# Altium PCB ublox_gnss_node.PcbDoc (part 5 of 5)
Units mm, origin at the board's own origin, x right, y up, seen from the top; angles counter-clockwise.
Board outline 84 x 108.04 mm, 6 copper layers (Top Layer (HSig), L2 GND, L3 Signal X, L4 PWR, L5 GND, Bottom Layer (Y)), stack 1.538 mm thick; 222 components, 159 nets, 892 pads, 1025 vias.
Unrouted connection lines stored in the file: 345.
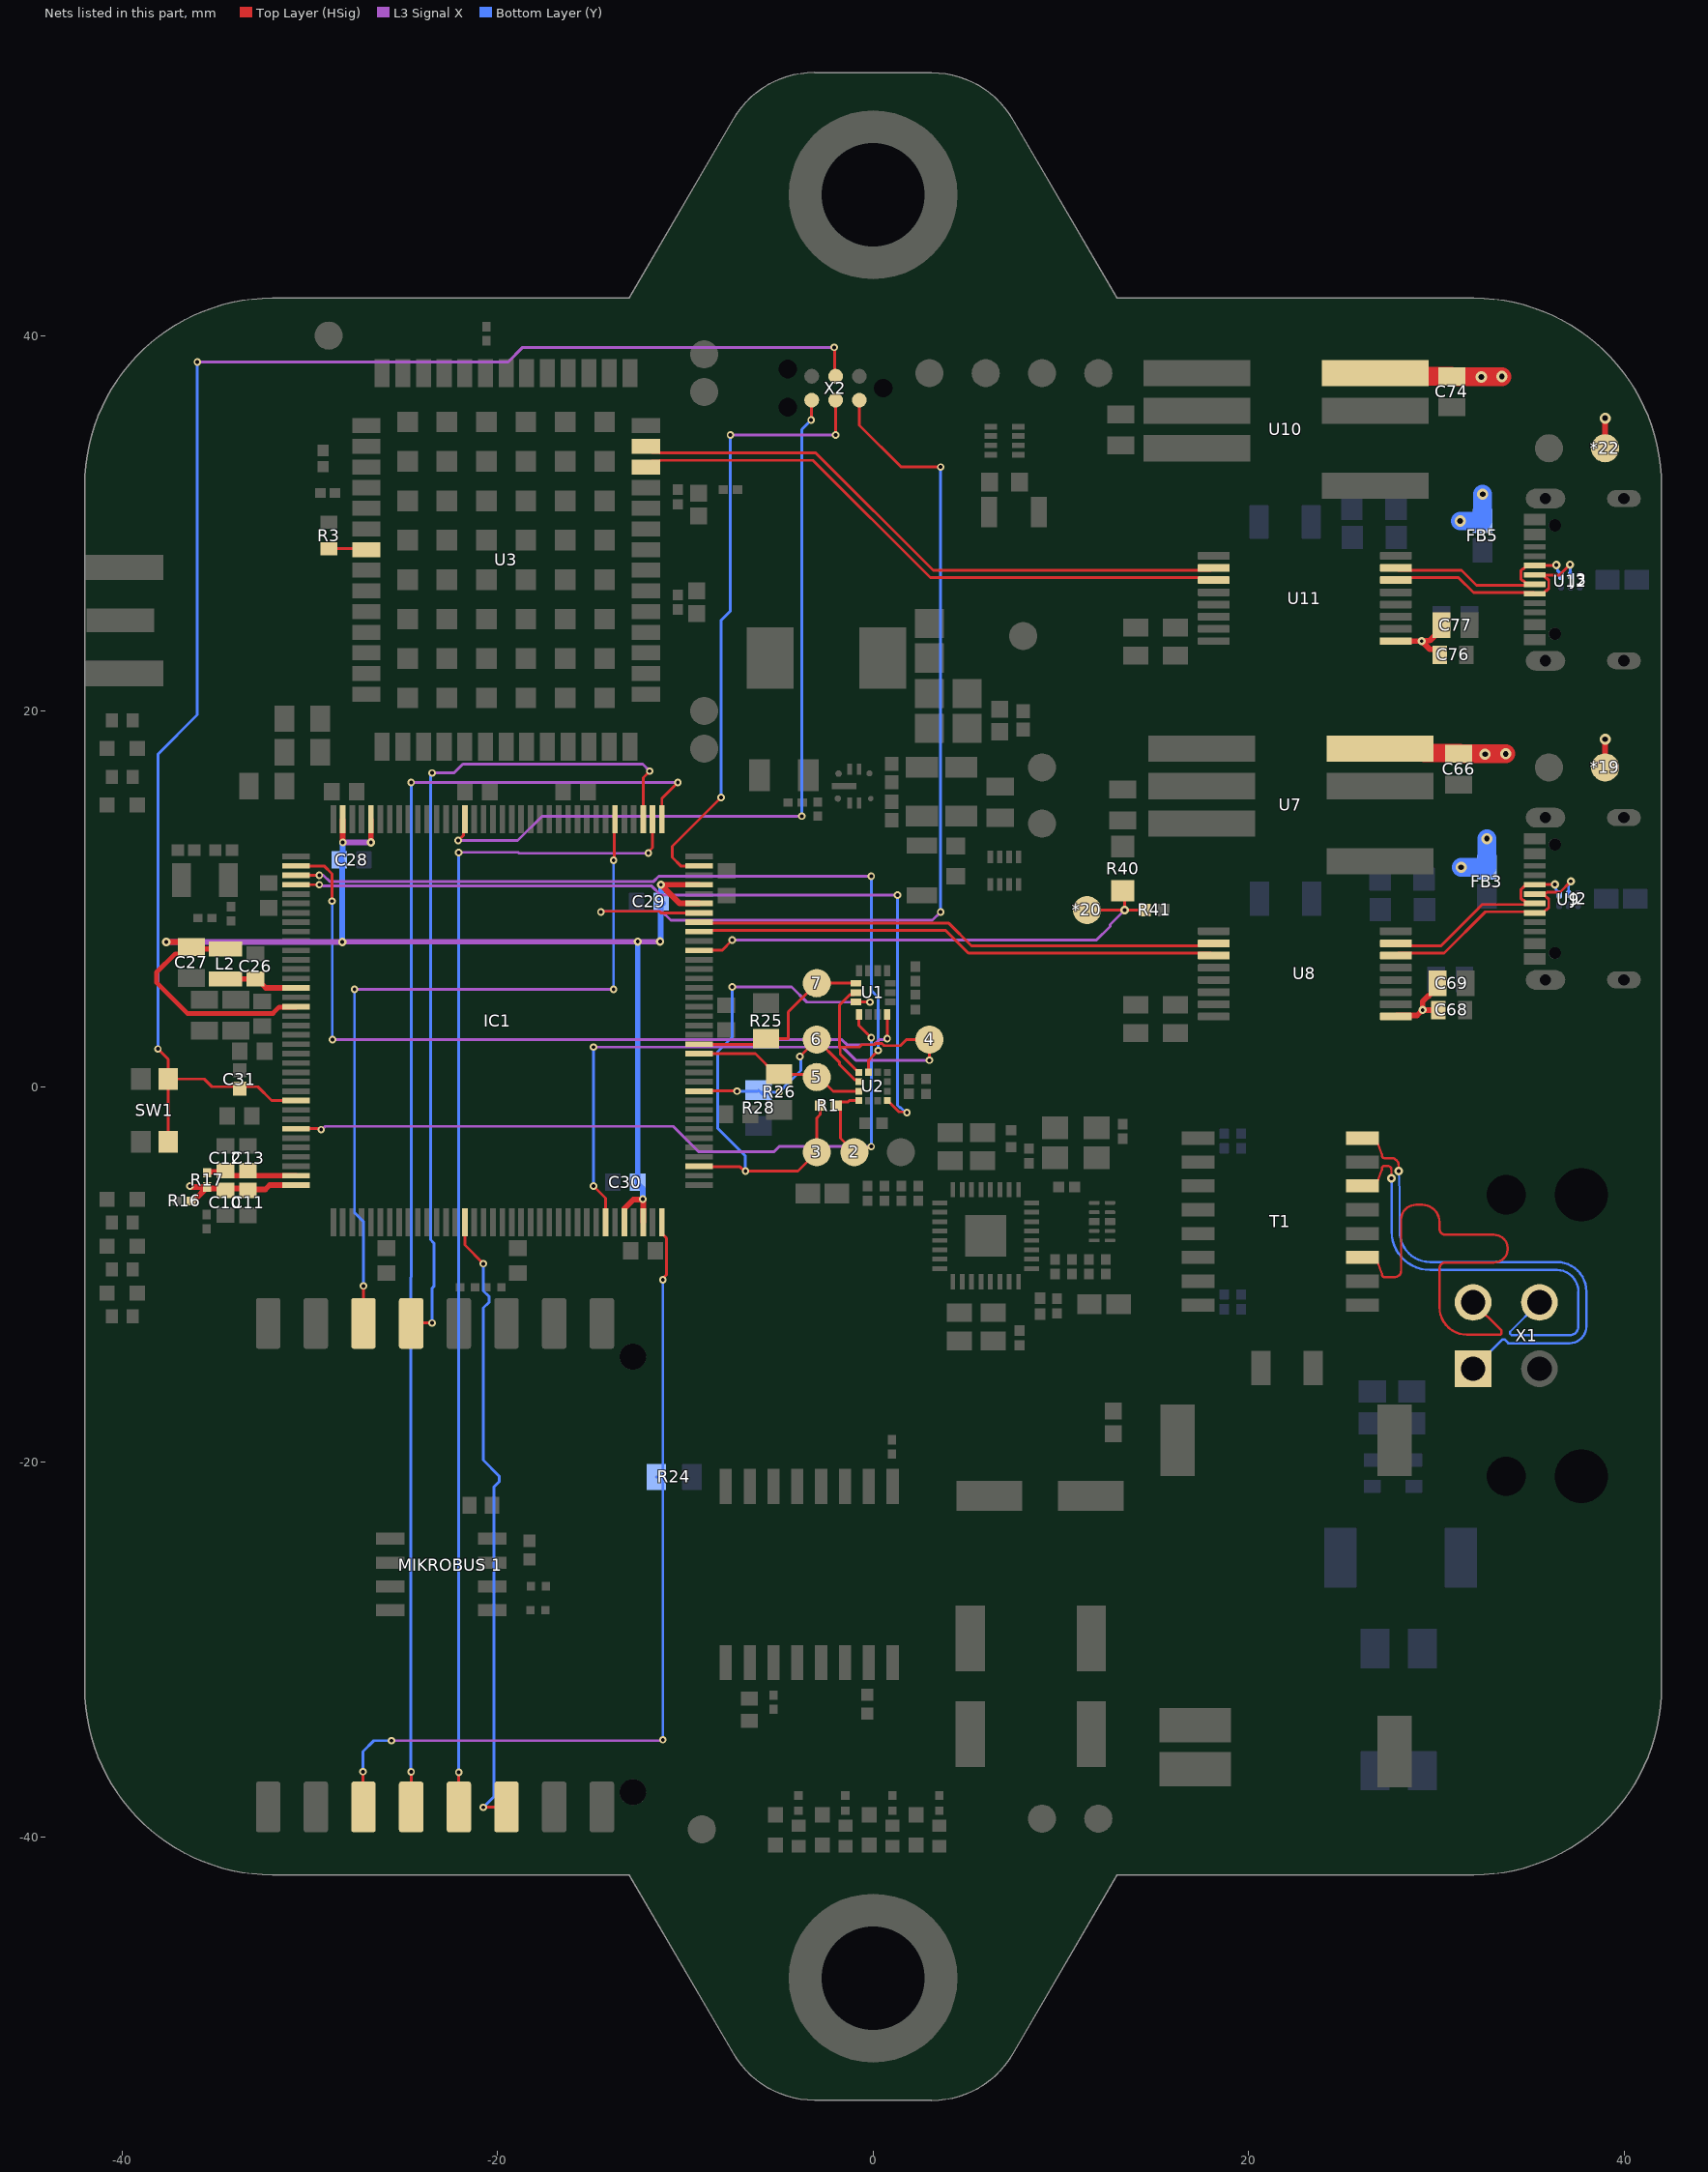
[diagram p8: the nets of this part, all layers, seen from the top]

## Via types
v1: diameter 0.4, hole 0.2, Top Layer (HSig) to Bottom Layer (Y), tented both sides, 916 vias
v2: diameter 0.45, hole 0.2, Top Layer (HSig) to Bottom Layer (Y), tented both sides, 53 vias
v3: diameter 0.6, hole 0.3, Top Layer (HSig) to Bottom Layer (Y), tented both sides, 35 vias
v4: diameter 0.7, hole 0.5, Top Layer (HSig) to Bottom Layer (Y), tented both sides, 13 vias
v5: diameter 0.6, hole 0.4, Top Layer (HSig) to Bottom Layer (Y), tented both sides, 8 vias

## Nets (pads, with @x,y where several pads share a name; then routed paths per layer and width w, separated by ;. In a path a pad name is that pad's centre, name@x,y a point inside that pad or via, vN(x,y) a via of type N, cw(c..) or ccw(c..) an arc to the next point about the centre after c; other vN are vias at no path point) (continued)
RX_P: T1.11 X1.2 | length 25.9
  Top Layer (HSig) w0.124: T1.11@26.075,-9.105 26.888,-9.393 27.102,-9.969 cw(c26.95,-10.025) 27.112,-10.026 ccw(c27.236,-10.026) 27.236,-10.15 27.8,-10.15 ccw(c27.8,-9.824) 28.126,-9.824 28.126,-7.1 cw(c28.925,-7.1) 28.925,-6.301 29.25,-6.301 cw(c29.25,-7.226) 30.175,-7.226 30.175,-7.307 30.175,-7.581 ccw(c30.491,-7.581) 30.491,-7.897 33.072,-7.897 cw(c33.072,-8.637) 33.072,-9.377 30.491,-9.377 ccw(c30.491,-9.693) 30.175,-9.693 30.175,-10.792 30.175,-11.75 ccw(c31.65,-11.75) 31.65,-13.225 33.402,-13.225 33.475,-13.152 33.475,-13.011 X1.2@31.964,-11.5
SENS_ISM_INT: IC1.2 U1.4 | length 42
  Top Layer (HSig) w0.15: IC1.2@-30.738,11.75 -29.25,11.75 -28.825,11.325 v1(-28.825,9.875) ; v1(0.75,2.55) U1.4@0.75,3.838
  L3 Signal X w0.15: v1(-28.8,2.5) -1.67,2.5 -1.395,2.225 0.055,2.225 0.332,2.502 0.702,2.502 v1(0.75,2.55)
  Bottom Layer (Y) w0.15: v1(-28.825,9.875) -28.813,9.862 -28.813,2.512 v1(-28.8,2.5)
SENS_LSM_INT: IC1.3 U2.12 | length 41.7
  Top Layer (HSig) w0.15: IC1.3@-30.738,11.25 v1(-29.5,11.25) ; U2.12@-0.25,0.763 -0.25,1.396 0.229,1.875 0.275,1.875 v1(0.275,1.921)
  L3 Signal X w0.15: v1(-29.5,11.25) -29.28,11.25 -28.955,10.925 -11.691,10.925 -11.416,11.2 v1(-0.1,11.2)
  Bottom Layer (Y) w0.15: v1(-0.1,11.2) -0.1,5.12 0.275,4.745 v1(0.275,1.921)
SENS_LSM_INTM: IC1.4 U2.7 | length 45.4
  Top Layer (HSig) w0.15: IC1.4@-30.738,10.75 v1(-29.5,10.75) ; U2.7@0.763,-0.75 0.775,-0.75 1.378,-1.353 1.76,-1.353 v1(1.803,-1.397)
  L3 Signal X w0.15: v1(-29.5,10.75) -29.425,10.675 -11.791,10.675 -11.316,10.2 v1(1.3,10.2)
  Bottom Layer (Y) w0.15: v1(1.3,10.2) 1.3,-1 1.437,-1.137 1.476,-1.137 1.736,-1.397 v1(1.803,-1.397)
SPI3_MISO: "MIKROBUS 1.5" IC1.110 | length 62.9
  Top Layer (HSig) w0.15: -22.068,-38.38 v1(-22.068,-36.532) ; v1(-11.975,12.431) -11.931,12.431 -11.931,12.543 -11.75,12.724 IC1.110@-11.75,14.238
  L3 Signal X w0.15: v1(-22.075,12.468) -22.068,12.475 -18.905,12.475 -18.855,12.425 -11.981,12.425 v1(-11.975,12.431)
  Bottom Layer (Y) w0.15: v1(-22.075,12.468) -22.068,12.461 -22.068,10.462 -22.075,10.455 -22.075,-12.977 -22.068,-12.984 v1(-22.068,-36.532)
SPI3_MOSI: "MIKROBUS 1.6" IC1.51 | length 33.8
  Top Layer (HSig) w0.15: IC1.51@-21.75,-7.238 -21.75,-8.45 v1(-20.76,-9.44) ; v1(-20.76,-38.4) -20.74,-38.38 -19.528,-38.38
  Bottom Layer (Y) w0.15: v1(-20.76,-38.4) -20.2,-37.84 -20.2,-21.33 -19.925,-21.055 -19.925,-20.745 -20.76,-19.91 -20.76,-11.796 -20.46,-11.496 -20.46,-11.185 -20.76,-10.885 v1(-20.76,-9.44)
SPI3_SCLK: "MIKROBUS 1.4" IC1.109 | length 71.1
  Top Layer (HSig) w0.15: -24.608,-38.38 v1(-24.608,-36.508) ; IC1.109@-11.25,14.238 -11.25,15.35 v1(-10.4,16.2)
  L3 Signal X w0.15: v1(-24.608,16.192) -24.6,16.2 -24.596,16.196 -10.404,16.196 v1(-10.4,16.2)
  Bottom Layer (Y) w0.15: v1(-24.608,-36.508) -24.625,-36.492 -24.625,-10.166 -24.608,-10.149 v1(-24.608,16.192)
SPI_CS: "MIKROBUS 1.3" IC1.72 R24.1 | length 47
  Top Layer (HSig) w0.15: v1(-27.175,-36.5) -27.175,-38.353 -27.148,-38.38 ; IC1.72@-11.25,-7.238 -11.25,-7.826 -11,-8.076 -11,-10.032 -11.2,-10.232 v1(-11.2,-10.3)
  L3 Signal X w0.15: v1(-25.65,-34.85) -11.25,-34.85 v1(-11.2,-34.8)
  Bottom Layer (Y) w0.15: v1(-27.175,-36.5) -27.175,-35.425 -26.6,-34.85 v1(-25.65,-34.85) ; R24.1@-11.55,-20.8 R24.1@-11.5,-20.8 ; v1(-11.2,-34.8) v1(-11.2,-10.3)
SPI_CS_ISM: 7.1 IC1.88 R25.1 U1.12 | length 10.5
  Top Layer (HSig) w0.15: IC1.88@-9.262,2.25 -6,2.25 R25.1@-5.7,2.55 -4.525,2.55 -4.525,3.975 7.1@-3,5.5 U1.12@-0.913,5.5
SPI_CS_MAG: 5.1 IC1.87 R26.1 U2.3 | length 10.1
  Top Layer (HSig) w0.15: IC1.87@-9.262,1.75 -6.275,1.75 -5.175,0.65 R26.1@-5,0.65 -3.025,0.65 -2.125,-0.25 U2.3@-0.763,-0.25 ; 5.1@-2.95,0.125 -3,0.175 5.1@-3,0.5 ; 5.1@-3,0.5 -3,0.312 5.1@-3,0.5
SPI_CS_XL: 6.1 IC1.83 R28.1 U2.2 | length 11.6
  Top Layer (HSig) w0.15: IC1.83@-9.262,-0.25 -9.237,-0.225 -7.275,-0.225 v1(-7.25,-0.25) ; v1(-3.9,1.6) 6.1@-3,2.5 -1.8,1.3 -1.8,1.178 -0.972,0.35 -0.875,0.35 -0.788,0.263 -0.788,0.225 U2.2@-0.763,0.25
  Bottom Layer (Y) w0.15: v1(-7.25,-0.25) -6.15,-0.25 R28.1@-6.1,-0.2 R28.1@-6,-0.3 ; R28.1@-5.706,-0.425 -5.875,-0.425 R28.1@-6,-0.3 ; v1(-3.9,1.6) -3.852,1.552 -3.852,0.848 v1(-5,-0.3) R28.1@-6,-0.3
SPI_MISO: 2.1 IC1.30 R1.2 U1.1 U2.4 | length 43.9
  Top Layer (HSig) w0.15: IC1.30@-30.738,-2.25 -29.45,-2.25 v1(-29.4,-2.3) ; U2.4@-0.763,-0.75 -1.273,-0.75 -1.339,-0.816 -1.763,-0.816 R1.2@-1.963,-1.016 -1.938,-1.016 -1.738,-1.216 -1.738,-2.762 2.1@-1,-3.5 -0.748,-3.248 -0.148,-3.248 v1(-0.1,-3.2) ; U1.1@-0.75,3.838 -0.75,3.25 v1(-0.1,2.6)
  L3 Signal X w0.15: v1(-29.4,-2.3) -29.362,-2.3 -29.187,-2.125 -10.645,-2.125 -9.295,-3.475 -5.275,-3.475 -5,-3.2 v1(-0.1,-3.2)
  Bottom Layer (Y) w0.15: v1(-0.1,-3.2) v1(-0.1,2.6)
SPI_MOSI: 3.1 IC1.75 R1.1 U1.14 | length 28.5
  Top Layer (HSig) w0.15: IC1.75@-9.262,-4.25 -9.228,-4.284 -7.083,-4.284 -6.868,-4.5 v1(-6.8,-4.5) -4,-4.5 3.1@-3,-3.5 -3,-1.681 -2.813,-1.494 R1.1@-2.813,-1.016 ; U1.14@-0.913,4.5 -0.91,4.497 -0.174,4.497 v1(-0.171,4.494)
  L3 Signal X w0.15: v1(-7.5,5.3) -4.334,5.3 -3.528,4.494 v1(-0.171,4.494)
  Bottom Layer (Y) w0.15: v1(-7.5,5.3) -7.5,2.626 -8.275,1.851 -8.275,-2.225 -6.8,-3.7 v1(-6.8,-4.5)
SPI_SCK: 4.1 IC1.66 U1.13 U2.1 | length 39.1
  Top Layer (HSig) w0.15: v1(-14.9,-5.3) -14.25,-5.95 IC1.66@-14.25,-7.238 ; U1.13@-0.913,5 -1.012,4.9 -1.222,4.9 -1.8,4.322 -1.8,2.1 ; U2.1@-0.763,0.75 -0.775,0.75 -1.752,1.727 -1.752,2.052 -1.8,2.1 ; v1(3,1.4) 4.1@3,2.5 1.777,2.5 1.452,2.175 0.595,2.175 0.474,2.296 0.126,2.296 0.055,2.225 -0.602,2.225 -0.727,2.1 -1.8,2.1
  L3 Signal X w0.15: v1(-14.9,2.1) -1.623,2.1 -0.923,1.4 v1(3,1.4)
  Bottom Layer (Y) w0.15: v1(-14.9,-5.3) v1(-14.9,2.1)
SYS_nRESET: C31.2 IC1.27 SW1.1 SW1.3 X2.3 | length 85.8
  Top Layer (HSig) w0.15: v1(-38.1,2) -37.55,1.45 SW1.1@-37.55,0.4 ; SW1.3@-37.55,-2.95 SW1.1@-37.55,0.4 ; IC1.27@-30.738,-0.75 -32.04,-0.75 -32.775,-0.015 -35.22,-0.015 -35.635,0.4 SW1.1@-37.55,0.4 ; v1(-2.075,39.375) -2.037,39.338 -2.037,37.872 X2.3@-2,37.835
  L3 Signal X w0.15: v1(-36,38.6) -19.441,38.6 -18.666,39.375 v1(-2.075,39.375)
  Bottom Layer (Y) w0.15: v1(-38.1,2) -38.1,17.7 -36,19.8 v1(-36,38.6)
SYS_SWDCLK: IC1.107 X2.4 | length 32.9
  Top Layer (HSig) w0.15: IC1.107@-9.262,11.75 -10.25,11.75 -10.7,12.2 -10.7,12.8 v1(-8.1,15.4) ; v1(-2,34.7) X2.4@-2,36.565
  L3 Signal X w0.15: v1(-7.6,34.7) v1(-2,34.7)
  Bottom Layer (Y) w0.15: v1(-8.1,15.4) -8.1,24.834 -7.6,25.334 v1(-7.6,34.7)
SYS_SWDIO: IC1.102 X2.2 | length 54.1
  Top Layer (HSig) w0.15: v1(-14.5,9.3) -14.465,9.335 -11.387,9.335 -11.302,9.25 IC1.102@-9.262,9.25 ; X2.2@-0.73,36.565 -0.73,35.225 1.495,33 v1(3.6,33)
  L3 Signal X w0.15: v1(-14.5,9.3) -14.465,9.335 -11.257,9.335 -10.772,8.85 3.15,8.85 v1(3.6,9.3)
  Bottom Layer (Y) w0.15: v1(3.6,9.3) v1(3.6,33)
SYS_SWO: IC1.130 X2.6 | length 42.5
  Top Layer (HSig) w0.15: v1(-22.1,13.1) -21.825,13.375 -21.825,14.163 IC1.130@-21.75,14.238 ; v1(-3.3,35.5) -3.285,35.515 -3.285,36.55 X2.6@-3.27,36.565
  L3 Signal X w0.15: v1(-22.1,13.1) -18.93,13.1 -17.629,14.4 v1(-3.8,14.4)
  Bottom Layer (Y) w0.15: v1(-3.8,14.4) -3.8,35 v1(-3.3,35.5)
TX_N: T1.14 X1.3 | length 25.4
  Top Layer (HSig) w0.124: T1.14@26.075,-5.295 26.888,-5.007 27.102,-4.431 ccw(c26.95,-4.375) 27.112,-4.375 27.112,-4.361 cw(c27.236,-4.361) 27.236,-4.237 27.425,-4.237 cw(c27.425,-4.423) 27.611,-4.423 v2(27.611,-4.889)
  Bottom Layer (Y) w0.124: v2(27.611,-4.889) 27.626,-4.889 27.626,-7.726 ccw(c29.675,-7.726) 29.675,-9.775 36.425,-9.775 cw(c36.425,-10.925) 37.575,-10.925 37.575,-12.776 cw(c37.1,-12.776) 37.1,-13.251 34.015,-13.251 33.933,-13.169 33.933,-13.067 X1.3@35.5,-11.5
TX_P: T1.16 X1.1 | length 27.2
  Top Layer (HSig) w0.124: T1.16@26.075,-2.755 26.888,-3.043 27.102,-3.619 cw(c26.95,-3.675) 27.112,-3.675 27.112,-3.689 ccw(c27.236,-3.689) 27.236,-3.813 27.594,-3.813 cw(c27.594,-4.219) 28,-4.219 v2(28,-4.5)
  Bottom Layer (Y) w0.124: v2(28,-4.5) 28.05,-5.569 cw(c27.926,-5.575) 28.05,-5.575 28.05,-7.726 ccw(c29.675,-7.726) 29.675,-9.351 36.425,-9.351 cw(c36.425,-10.925) 37.999,-10.925 37.999,-12.776 cw(c37.1,-12.776) 37.1,-13.675 33.839,-13.675 33.633,-13.469 33.531,-13.469 X1.1@31.964,-15.036
UART5_RX: "MIKROBUS 1.14" IC1.114 | length 40.9
  Top Layer (HSig) w0.15: v1(-27.15,-10.625) -27.15,-12.618 -27.148,-12.62 ; v1(-13.825,12.05) -13.787,12.087 -13.787,14.201 IC1.114@-13.75,14.238
  L3 Signal X w0.15: v1(-27.625,5.175) v1(-13.825,5.175)
  Bottom Layer (Y) w0.15: v1(-27.625,5.175) -27.625,-6.714 -27.148,-7.191 -27.148,-10.623 v1(-27.15,-10.625) ; v1(-13.825,5.175) v1(-13.825,12.05)
UART5_TX: "MIKROBUS 1.13" IC1.111 | length 45.2
  Top Layer (HSig) w0.15: -24.608,-12.62 -24.588,-12.6 v1(-23.5,-12.6) ; IC1.111@-12.25,14.238 -12.25,16.45 v1(-11.9,16.8)
  L3 Signal X w0.15: v1(-23.5,16.7) -22.33,16.7 -21.855,17.175 -12.275,17.175 v1(-11.9,16.8)
  Bottom Layer (Y) w0.15: v1(-23.5,-12.6) -23.5,-10.751 -23.4,-10.651 -23.4,-8.335 -23.575,-8.16 -23.575,16.557 -23.5,16.632 v1(-23.5,16.7)
USB_D_N: U3.39 U11.11 | length 33
  Top Layer (HSig) w0.15: U3.39@-12.1,33 -11.775,33.325 -11.368,33.325 -11.337,33.356 -3.204,33.356 3.046,27.106 17.287,27.106 17.288,27.105 18.02,27.105 U11.11@18.15,26.975
USB_D_P: U3.40 U11.10 | length 33
  Top Layer (HSig) w0.15: U3.40@-12.1,34.1 -11.775,33.775 -11.368,33.775 -11.337,33.744 -3.044,33.744 3.206,27.494 17.287,27.494 17.288,27.495 18.02,27.495 U11.10@18.15,27.625
USB_ISOLATED_D_N: J2.A7 J2.B7 U8.6 U9.2 | length 13
  Top Layer (HSig) w0.15: U8.6@27.85,6.975 27.98,7.105 28.712,7.105 28.713,7.106 30.417,7.106 32.617,9.306 35.194,9.306 J2.B7@35.25,9.25 ; J2.B7@35.745,9.325 35.845,9.425 35.892,9.425 35.995,9.528 35.995,9.972 35.792,10.175 35.325,10.175 J2.A7@35.25,10.25 35.792,10.25 35.9,10.357 36.6,10.357 v2(37.175,10.932)
  Bottom Layer (Y) w0.15: U9.2@37.05,10.25 37.05,10.726 37.175,10.851 v2(37.175,10.932)
USB_ISOLATED_D_P: J2.A6 J2.B6 U8.7 U9.1 | length 11.9
  Top Layer (HSig) w0.15: U8.7@27.85,7.625 27.98,7.495 28.712,7.495 28.713,7.494 30.256,7.494 32.456,9.694 J2.A6@34.886,9.694 ; J2.A6@34.905,9.675 J2.A6@34.886,9.694 ; J2.A6@35.25,9.75 35.194,9.694 J2.A6@34.886,9.694 ; v2(36.325,10.757) 36.321,10.754 35.254,10.754 J2.B6@35.25,10.75 35.175,10.675 34.708,10.675 34.505,10.472 34.505,10.028 34.608,9.925 34.655,9.925 J2.A6@34.886,9.694
  Bottom Layer (Y) w0.15: v2(36.325,10.757) 36.382,10.7 36.382,10.482 36.55,10.314 U9.1@36.55,10.225
USB_ISOLATED_GNSS_D_N: J3.A7 J3.B7 U11.6 U12.2 | length 12.2
  Top Layer (HSig) w0.15: U11.6@27.85,26.975 27.98,27.105 28.712,27.105 28.713,27.106 31.183,27.106 31.983,26.306 35.194,26.306 J3.B7@35.25,26.25 35.67,26.25 35.845,26.425 35.892,26.425 35.995,26.528 35.995,26.972 35.892,27.075 35.845,27.075 J3.A7@35.67,27.25 ; J3.A7@35.25,27.25 J3.A7@35.67,27.25 ; v2(37.125,27.8) 36.575,27.25 J3.A7@35.67,27.25
  Bottom Layer (Y) w0.15: v2(37.125,27.8) 37.138,27.788 37.138,27.237 U12.2@37.15,27.225
USB_ISOLATED_GNSS_D_P: J3.A6 J3.B6 U11.7 U12.1 | length 11.8
  Top Layer (HSig) w0.15: U11.7@27.85,27.625 27.98,27.495 28.712,27.495 28.713,27.494 31.344,27.494 32.144,26.694 35.194,26.694 J3.A6@35.25,26.75 34.83,26.75 34.655,26.925 34.608,26.925 34.505,27.028 34.505,27.472 34.608,27.575 34.655,27.575 34.83,27.75 J3.B6@35.25,27.75 35.262,27.762 36.388,27.762 v2(36.4,27.775)
  Bottom Layer (Y) w0.15: v2(36.4,27.775) 36.457,27.718 36.457,27.481 36.65,27.289 U12.1@36.65,27.2
USB_MCU_D_N: IC1.100 U8.11 | length 28
  Top Layer (HSig) w0.15: IC1.100@-9.262,8.25 -9.206,8.306 3.877,8.306 5.077,7.106 17.287,7.106 17.288,7.105 18.02,7.105 U8.11@18.15,6.975
USB_MCU_D_P: IC1.101 U8.10 | length 28
  Top Layer (HSig) w0.15: IC1.101@-9.262,8.75 -9.206,8.694 4.038,8.694 5.238,7.494 17.287,7.494 17.288,7.495 18.02,7.495 U8.10@18.15,7.625
VBUS_DETECT_MCU: *20.1 IC1.98 R40.2 R41.2 | length 27.7
  Top Layer (HSig) w0.15: IC1.98@-9.262,7.25 -8.05,7.25 v1(-7.5,7.8) ; *20.1@11.4,9.4 v2(13.4,9.4) ; R40.2@13.3,10.425 13.4,10.325 v2(13.4,9.4) ; R41.2@14.4,9.4 v2(13.4,9.4)
  L3 Signal X w0.15: v1(-7.5,7.8) 11.9,7.8 12.621,8.521 12.621,8.621 v2(13.4,9.4)
VBUS_GNSS: *22.1 C74.2 C76.2 C77.1 FB5.2 U10.1 U11.1 | length 15.2
  Top Layer (HSig) w0.3: U11.1@27.85,23.725 v2(29.225,23.725) ; C76.2@30.19,23 30.19,23.059 29.96,23.289 29.661,23.289 v2(29.225,23.725) ; C77.1@30.275,24.575 30.275,24.375 29.654,23.754 29.254,23.754 v2(29.225,23.725) ; *22.1@39,34 v3(39,35.6)
  Top Layer (HSig) w1: U10.1@26.75,38 26.91,37.84 30.805,37.84 C74.2@30.825,37.82 v3(33.5,37.82)
  Bottom Layer (Y) w1: v3(31.275,30.125) 32.474,30.125 FB5.2@32.475,30.126 v3(32.475,31.55)
  other v3: 32.4,37.8
VBUS_MCU: *19.1 C66.2 C68.2 C69.1 FB3.2 U7.1 U8.1 | length 15.4
  Top Layer (HSig) w0.3: U8.1@27.85,3.725 27.905,3.78 28.98,3.78 v2(29.275,4.075) ; C68.2@30.04,4.075 v2(29.275,4.075) ; C69.1@30.075,5.5 30.075,5.3 29.59,4.815 29.556,4.815 29.275,4.534 v2(29.275,4.075) ; *19.1@39,17 v3(39,18.5)
  Top Layer (HSig) w1: U7.1@27,18 29.146,18 29.381,17.765 C66.2@31.255,17.765 ; C66.2@31.2,17.72 v3(33.7,17.72)
  Bottom Layer (Y) w1: v3(31.325,11.675) 32.699,11.675 FB3.2@32.7,11.676 v3(32.7,13.2)
  other v3: 32.6,17.7
VCAP: C27.2 C28.2 C29.2 C30.2 IC1.17 IC1.68 IC1.70 IC1.103 IC1.105 IC1.140 IC1.143 L2.2 | length 75.1
  Top Layer (HSig) w0.25: C27.2@-36.327,7.424 -36.682,7.069 -37.181,7.069 -38.175,6.075 -38.175,5.539 -36.526,3.89 -31.973,3.89 -31.638,4.225 -30.763,4.225 IC1.17@-30.738,4.25
  Top Layer (HSig) w0.3: v2(-37.65,7.7) -36.555,7.7 C27.2@-36.3,7.445 ; C27.2@-36.54,7.445 C27.2@-36.3,7.445 ; L2.2@-34.5,7.325 -36.18,7.325 C27.2@-36.3,7.445 ; v1(-28.25,13) IC1.143@-28.25,14.238 ; v2(-26.75,13) IC1.140@-26.75,14.238 ; IC1.68@-13.25,-7.238 -13.25,-6.497 -12.772,-6.019 -12.294,-6.019 v1(-12.275,-6) -12.275,-6.027 -12.25,-6.052 IC1.70@-12.25,-7.238 ; IC1.103@-9.262,9.75 -10.3,9.75 v2(-11.3,10.75) IC1.105@-9.262,10.75
  L3 Signal X w0.3: v2(-37.65,7.7) v2(-28.275,7.7) -28.263,7.712 -11.363,7.712 v2(-11.35,7.725) ; v1(-28.25,13) v2(-26.75,13) ; v2@-12.55,7.725 v2(-12.54,7.715)
  Bottom Layer (Y) w0.3: v2(-28.275,7.7) -28.275,12.015 -28.435,12.175 -28.25,12.36 v1(-28.25,13) ; v2(-12.54,7.715) -12.54,-5.175 -12.275,-5.44 v1(-12.275,-6) ; v2(-11.35,7.725) -11.321,7.754 C29.2@-11.321,9.75 ; v2(-11.3,10.75) -11.295,10.745 -11.295,9.855 C29.2@-11.19,9.75
VCC_RF: R3.2 U3.7 | length 2
  Top Layer (HSig) w0.155: R3.2@-29,28.65 -27.05,28.65 U3.7@-27,28.6
VDD_REF: C12.2 C13.2 IC1.35 R17.2 | length 4.9
  Top Layer (HSig) w0.3: R17.2@-35.475,-4.6 -35.418,-4.543 -34.557,-4.543 C12.2@-34.5,-4.485 ; C12.2@-34.5,-4.51 -34.26,-4.75 IC1.35@-30.738,-4.75
VDD_SMPS_OUT: C26.1 IC1.15 L2.1 | length 3.9
  Top Layer (HSig) w0.3: L2.1@-34.5,5.725 -34.498,5.727 -32.903,5.727 C26.1@-32.9,5.73 ; C26.1@-32.83,5.73 -32.35,5.25 IC1.15@-30.738,5.25
VDDA: C10.2 C11.2 IC1.36 R16.2 R17.1 | length 7.2
  Top Layer (HSig) w0.3: v1(-36.4,-5.3) -36.373,-5.3 -36.323,-5.35 R17.1@-35.475,-5.35 R17.1@-35.475,-5.357 ; R16.2@-36.325,-6.1 -36.25,-6.025 -36.125,-6.025 -35.475,-5.375 R17.1@-35.475,-5.357 ; C10.2@-34.5,-5.515 C10.2@-34.582,-5.432 ; IC1.36@-30.738,-5.25 -32.14,-5.25 -32.38,-5.49 -33.25,-5.49 C11.2@-33.3,-5.54 -33.408,-5.432 C10.2@-34.582,-5.432 ; R17.1@-35.475,-5.357 -35.4,-5.432 C10.2@-34.582,-5.432
pads on no net: "MIKROBUS 1.0" B1.3 IC1.25 IC1.26 IC1.28 IC1.31 IC1.43 IC1.44 IC1.45 IC1.50 IC1.52 IC1.57 IC1.58 IC1.59 IC1.60 IC1.61 IC1.62 IC1.63 IC1.64 IC1.65 IC1.67 IC1.78 IC1.81 IC1.82 IC1.93 IC1.94 IC1.99 IC1.108 IC1.112 IC1.113 IC1.115 IC1.116 IC1.117 IC1.120 IC1.123 IC1.125 IC1.127 IC1.131 IC1.132 IC1.133 IC1.134 IC1.136 IC1.137 IC3.4 IC3.5 IC3.6 IC3.11 IC3.12 IC3.13 IC3.14 J2. J2.A8 J2.B8 J3. J3.A8 J3.B8 T1.4 T1.5 T1.12 T1.13 U1.9 U1.10 U1.11 U2.11 U3.4 U3.5 U3.6 U3.8 U3.9 U3.10 U3.11 U3.13 U3.15 U3.16 U3.17 U3.18 U3.21 U3.22 U3.23 U3.24 U3.25 U3.28 U3.29 U3.30 U3.31 U3.35 U3.44 U3.45 U3.46 U3.47 U3.50 U3.52 U3.54 U4.13 U4.20 U4.21 U4.22 U6.2 U7.4 U7.5 U8.4 U8.5 U8.12 U8.13 U9.3 U9.5 U10.4 U10.5 U11.4 U11.5 U11.12 U11.13 U12.3 U12.5 U13.8 U14.8 X1.6 X1.7 X1.8 X1.9 X2.

## Polygon pours and split planes (outlines as drawn)
+3V3 on L4 PWR "+3V3_L04_P003" (solid, pour order 3): 20.5,41.5 -41.5,41.5 -41.5,-41.5 20.5,-41.5
GND on L4 PWR "GND_L04_P023" (solid, pour order 23): 23.5,0.5 41.5,0.5 41.5,-41.5 23.5,-41.5
VBUS_MCU on L4 PWR "VBUS_MCU_L04_P000" (solid, pour order 0): 23.5,19 41.5,19 41.5,3.5 23.5,3.5
VBUS_GNSS on L4 PWR "VBUS_GNSS_L04_P006" (solid, pour order 6): 23.5,41.5 23.5,22 41.5,22 41.5,31.5 ccw(c31.75,31.75) 32,41.5
GND on Top Layer (HSig) "TOP_GND_POLYGON" (solid, remove dead copper, pour order 7): -41.5,38.96 cw(c-38.96,38.96) -38.96,41.5 20.5,41.5 20.5,-41.5 -38.955,-41.5 cw(c-38.96,-38.96) -41.5,-38.96 -41.5,-32
GND_ETH on Top Layer (HSig) "GND_ETH_L01_P010" (solid, pour order 10): 23.5,0.5 41.5,0.5 41.5,-41 cw(c41,-41) 41,-41.5 23.5,-41.5
GND on Top Layer (HSig) "GND_L01_P005" (solid, pour order 5): -26.986,38 -12,38 -12,18.1 -27.013,18.1
GND_BP on Top Layer (HSig) "GND_BP_L01_P009" (solid, pour order 9): 23.5,19 41.5,19 41.5,3.5 23.5,3.5
GND_BP2 on Top Layer (HSig) "GND_BP2_L01_P008" (solid, pour order 8): 23.5,41.5 41.5,41.5 41.5,22 23.5,22
GND on Bottom Layer (Y) "TOP_GND_POLYGON" (solid, pour order 18): -41.5,38.96 cw(c-38.96,38.96) -38.96,41.5 20.5,41.5 20.5,-41.5 -38.954,-41.5 cw(c-38.96,-38.96) -41.5,-38.96 -41.5,-32
GND_ETH on Bottom Layer (Y) "GND_ETH_L06_P015" (solid, pour order 15): 23.5,0.5 41.5,0.5 41.5,-41 cw(c41,-41) 41,-41.5 23.5,-41.5
GND_BP2 on Bottom Layer (Y) "GND_BP2_L06_P017" (solid, pour order 17): 23.5,41.5 41.5,41.5 41.5,22 23.5,22
GND_BP on Bottom Layer (Y) "GND_BP_L06_P016" (solid, pour order 16): 23.5,19 41.5,19 41.5,3.5 23.5,3.5
GND on L3 Signal X "GND_L03_P011" (solid, pour order 11): 20.5,41.5 20.5,-41.5 -38.955,-41.5 cw(c-38.96,-38.96) -41.5,-38.96 -41.5,38.96 cw(c-38.96,38.96) -38.96,41.5
GND_ETH on L3 Signal X "GND_ETH_L03_P014" (solid, pour order 14): 23.5,0.5 41.5,0.5 41.5,-41 cw(c41,-41) 41,-41.5 23.5,-41.5
GND_BP on L3 Signal X "GND_BP_L03_P013" (solid, pour order 13): 23.5,19 41.5,19 41.5,3.5 23.5,3.5
GND_BP2 on L3 Signal X "GND_BP2_L03_P012" (solid, pour order 12): 23.5,41.5 41.5,41.5 41.5,22 23.5,22
GND on L5 GND (split plane): 12.9,41.499 12.935,41.496 12.969,41.49 12.985,41.491 13,41.49 20.498,41.49 20.498,2 20.498,-41.49 13,-41.49 12.984,-41.491 12.969,-41.491 12.935,-41.496 12.9,-41.499 12.898,-41.5 -12.898,-41.5 -12.9,-41.499 -12.935,-41.496 -12.969,-41.49 -12.985,-41.491 -13,-41.49 -32,-41.49 -32.02,-41.492 -32.438,-41.482 -32.876,-41.452 -33.311,-41.401 -33.744,-41.33 -34.173,-41.24 -34.598,-41.13 -35.016,-41 -35.429,-40.851 -35.834,-40.683 -36.231,-40.497 -36.619,-40.292 -36.997,-40.07 -37.364,-39.831 -37.72,-39.575 -38.064,-39.303 -38.395,-39.015 -38.712,-38.712 -39.015,-38.395 -39.303,-38.064 -39.575,-37.72 -39.831,-37.364 -40.07,-36.997 -40.292,-36.619 -40.497,-36.231 -40.683,-35.834 -40.851,-35.429 -41,-35.016 -41.13,-34.598 -41.24,-34.173 -41.33,-33.744 -41.401,-33.311 -41.452,-32.876 -41.482,-32.438 -41.492,-32.02 -41.49,-32 -41.49,32 -41.492,32.02 -41.482,32.438 -41.452,32.876 -41.401,33.311 -41.33,33.744 -41.24,34.173 -41.13,34.598 -41,35.016 -40.851,35.429 -40.683,35.834 -40.497,36.231 -40.292,36.619 -40.07,36.997 -39.831,37.364 -39.575,37.72 -39.303,38.064 -39.015,38.395 -38.712,38.712 -38.395,39.015 -38.064,39.303 -37.72,39.575 -37.364,39.831 -36.997,40.07 -36.619,40.292 -36.231,40.497 -35.834,40.683 -35.429,40.851 -35.016,41 -34.598,41.13 -34.173,41.24 -33.744,41.33 -33.311,41.401 -32.876,41.451 -32.438,41.482 -32.02,41.492 -32,41.49 -13,41.49 -12.984,41.491 -12.969,41.491 -12.935,41.496 -12.9,41.499 -12.898,41.5 12.898,41.5
GND_ETH on L5 GND (split plane): 41.49,-32 41.492,-32.02 41.482,-32.438 41.452,-32.876 41.401,-33.311 41.33,-33.744 41.24,-34.173 41.13,-34.598 41,-35.016 40.851,-35.429 40.683,-35.834 40.497,-36.231 40.292,-36.619 40.07,-36.997 39.831,-37.364 39.575,-37.72 39.303,-38.064 39.015,-38.395 38.712,-38.712 38.395,-39.015 38.064,-39.303 37.72,-39.575 37.364,-39.831 36.997,-40.07 36.619,-40.292 36.231,-40.497 35.834,-40.683 35.429,-40.851 35.016,-41 34.598,-41.13 34.173,-41.24 33.744,-41.33 33.311,-41.401 32.876,-41.452 32.438,-41.482 32.02,-41.492 32,-41.49 23.502,-41.49 23.502,0.498 41.49,0.498
M5 on L5 GND (split plane): 36.898,-32.898 35.102,-32.898 35.102,-31.102 36.898,-31.102
GND_BP on L5 GND (split plane): 41.49,3.502 23.502,3.502 23.502,18.998 41.49,18.998
GND_BP2 on L5 GND (split plane): 32.438,41.482 32.876,41.452 33.311,41.401 33.744,41.33 34.173,41.24 34.598,41.13 35.016,41 35.429,40.851 35.834,40.683 36.231,40.497 36.619,40.292 36.997,40.07 37.364,39.831 37.72,39.575 38.064,39.303 38.395,39.015 38.712,38.712 39.015,38.395 39.303,38.064 39.575,37.72 39.831,37.364 40.07,36.997 40.292,36.619 40.497,36.231 40.683,35.834 40.851,35.429 41,35.016 41.13,34.598 41.24,34.173 41.33,33.744 41.401,33.311 41.452,32.876 41.482,32.438 41.492,32.02 41.49,32 41.49,22.002 23.502,22.002 23.502,41.49 32,41.49 32.02,41.492
GND on L2 GND (split plane): 12.9,41.499 12.935,41.496 12.969,41.49 12.985,41.491 13,41.49 20.498,41.49 20.498,2 20.498,-41.49 13,-41.49 12.984,-41.491 12.969,-41.491 12.935,-41.496 12.9,-41.499 12.898,-41.5 -12.898,-41.5 -12.9,-41.499 -12.935,-41.496 -12.969,-41.49 -12.985,-41.491 -13,-41.49 -32,-41.49 -32.02,-41.492 -32.438,-41.482 -32.876,-41.452 -33.311,-41.401 -33.744,-41.33 -34.173,-41.24 -34.598,-41.13 -35.016,-41 -35.429,-40.851 -35.834,-40.683 -36.231,-40.497 -36.619,-40.292 -36.997,-40.07 -37.364,-39.831 -37.72,-39.575 -38.064,-39.303 -38.395,-39.015 -38.712,-38.712 -39.015,-38.395 -39.303,-38.064 -39.575,-37.72 -39.831,-37.364 -40.07,-36.997 -40.292,-36.619 -40.497,-36.231 -40.683,-35.834 -40.851,-35.429 -41,-35.016 -41.13,-34.598 -41.24,-34.173 -41.33,-33.744 -41.401,-33.311 -41.452,-32.876 -41.482,-32.438 -41.492,-32.02 -41.49,-32 -41.49,32 -41.492,32.02 -41.482,32.438 -41.452,32.876 -41.401,33.311 -41.33,33.744 -41.24,34.173 -41.13,34.598 -41,35.016 -40.851,35.429 -40.683,35.834 -40.497,36.231 -40.292,36.619 -40.07,36.997 -39.831,37.364 -39.575,37.72 -39.303,38.064 -39.015,38.395 -38.712,38.712 -38.395,39.015 -38.064,39.303 -37.72,39.575 -37.364,39.831 -36.997,40.07 -36.619,40.292 -36.231,40.497 -35.834,40.683 -35.429,40.851 -35.016,41 -34.598,41.13 -34.173,41.24 -33.744,41.33 -33.311,41.401 -32.876,41.451 -32.438,41.482 -32.02,41.492 -32,41.49 -13,41.49 -12.984,41.491 -12.969,41.491 -12.935,41.496 -12.9,41.499 -12.898,41.5 12.898,41.5
GND_ETH on L2 GND (split plane): 41.49,-32 41.492,-32.02 41.482,-32.438 41.452,-32.876 41.401,-33.311 41.33,-33.744 41.24,-34.173 41.13,-34.598 41,-35.016 40.851,-35.429 40.683,-35.834 40.497,-36.231 40.292,-36.619 40.07,-36.997 39.831,-37.364 39.575,-37.72 39.303,-38.064 39.015,-38.395 38.712,-38.712 38.395,-39.015 38.064,-39.303 37.72,-39.575 37.364,-39.831 36.997,-40.07 36.619,-40.292 36.231,-40.497 35.834,-40.683 35.429,-40.851 35.016,-41 34.598,-41.13 34.173,-41.24 33.744,-41.33 33.311,-41.401 32.876,-41.452 32.438,-41.482 32.02,-41.492 32,-41.49 23.502,-41.49 23.502,0.498 41.49,0.498
M2 on L2 GND (split plane): 36.898,-30.898 35.102,-30.898 35.102,-29.102 36.898,-29.102
GND_BP on L2 GND (split plane): 41.49,3.502 23.502,3.502 23.502,18.998 41.49,18.998
GND_BP2 on L2 GND (split plane): 32.438,41.482 32.876,41.452 33.311,41.401 33.744,41.33 34.173,41.24 34.598,41.13 35.016,41 35.429,40.851 35.834,40.683 36.231,40.497 36.619,40.292 36.997,40.07 37.364,39.831 37.72,39.575 38.064,39.303 38.395,39.015 38.712,38.712 39.015,38.395 39.303,38.064 39.575,37.72 39.831,37.364 40.07,36.997 40.292,36.619 40.497,36.231 40.683,35.834 40.851,35.429 41,35.016 41.13,34.598 41.24,34.173 41.33,33.744 41.401,33.311 41.452,32.876 41.482,32.438 41.492,32.02 41.49,32 41.49,22.002 23.502,22.002 23.502,41.49 32,41.49 32.02,41.492

## Other copper
Top Layer (HSig):
  pour cut-out: -13.5,54.5 13.7,54.5 13.7,41.6 13.8,41.5 -13.5,41.5
  pour cut-out: -13.6,-41.5 13.6,-41.5 13.6,-54.4 13.7,-54.5 -13.6,-54.5
  pour cut-out: 39,-29 33,-29 33,-33 39,-33
  text "1" at 33.8,-30.525 h1
  text "TOP" at 33.25,-34.75 h1
L3 Signal X:
  pour cut-out: -13.6,-41.5 13.6,-41.5 13.6,-54.4 13.7,-54.5 -13.6,-54.5
  pour cut-out: -13.5,54.5 13.7,54.5 13.7,41.6 13.8,41.5 -13.5,41.5
  pour cut-out: 33,-29 39,-29 39,-33 33,-33
  text "3" at 37.7,-30.55 h1
L4 PWR:
  pour cut-out: -13.6,-41.5 13.6,-41.5 13.6,-54.4 13.7,-54.5 -13.6,-54.5
  pour cut-out: -13.5,54.5 13.7,54.5 13.7,41.6 13.8,41.5 -13.5,41.5
  pour cut-out: 33,-29 39,-29 39,-33 33,-33
  text "4" at 33.625,-32.55 h1
Bottom Layer (Y):
  pour cut-out: -13.5,54.5 13.7,54.5 13.7,41.6 13.8,41.5 -13.5,41.5
  pour cut-out: -13.6,-41.5 13.6,-41.5 13.6,-54.4 13.7,-54.5 -13.6,-54.5
  pour cut-out: 33,-29 39,-29 39,-33 33,-33
  text "6" at 38.333,-32.541 h1
  text "BOT" at 38.75,-34.75 h1
L2 GND (plane layer: these items are gaps in the copper):
  rectangle: -13.6,-54.5 13.6,-41.5
  rectangle: -13.5,41.5 13.7,54.5
  rectangle: 37,-31 39,-29
  rectangle: 35,-33 39,-31
  rectangle: 33,-31 35,-29
  rectangle: 33,-33 35,-31
  lines w0.2: 33,-31 35,-31 ; 33,-31 33,-33 35,-33 ; 33,-31 33,-29 35,-29 ; 35,-33 35,-31 ; 35,-33 37,-33 ; 35,-33 37,-33 ; 35,-31 37,-31 ; 35,-31 35,-29 ; 35,-31 37,-31 ; 35,-29 37,-29 ; 37,-33 37,-31 ; 37,-33 39,-33 39,-31 ; 37,-31 37,-29 ; 37,-31 39,-31 ; 37,-29 39,-29 39,-31
  lines w3: 22,-42 22,2 ; 22,20.5 42,20.5 ; 22,42 22,2 ; 42,2 41,2 22,2
  text "2" at 35.65,-30.5 h1
L5 GND (plane layer: these items are gaps in the copper):
  rectangle: -13.6,-54.5 13.6,-41.5
  rectangle: -13.5,41.5 13.7,54.5
  rectangle: 37,-33 39,-31
  rectangle: 33,-33 35,-31
  rectangle: 33,-31 39,-29
  lines w0.2: 33,-31 35,-31 ; 33,-31 33,-33 35,-33 ; 33,-31 33,-29 35,-29 ; 35,-33 35,-31 ; 35,-33 37,-33 ; 35,-33 37,-33 ; 35,-31 37,-31 ; 35,-31 35,-29 ; 35,-31 37,-31 ; 35,-29 37,-29 ; 37,-33 37,-31 ; 37,-33 39,-33 39,-31 ; 37,-31 37,-29 ; 37,-31 39,-31 ; 37,-29 39,-29 39,-31
  lines w3: 22,-42 22,2 ; 22,20.5 42,20.5 ; 22,42 22,2 ; 42,2 22,2
  text "5" at 35.675,-32.575 h1

## Silkscreen, mask and mechanical layers (free items; w line width, h text height)
Top Overlay:
  circle w0.4: c5.25,0.7 r0.2
  circle w0.4: c-1.665,8.731 r0.2
  lines w0.2: -3.265,8.731 -3.265,8.931 ; 5.25,-0.9 5.45,-0.9 ; -3.665,8.731 -3.265,8.531 -3.265,8.931 ; -3.665,8.731 -3.265,8.931 ; -3.665,8.731 -1.665,8.731 -1.665,10.731 ; -1.665,10.731 -1.865,10.331 -1.465,10.331 -1.665,10.731 ; 5.25,-1.3 5.25,0.7 7.25,0.7 ; 5.25,-1.3 5.45,-0.9 ; 5.25,-1.3 5.05,-0.9 5.45,-0.9 ; 7.25,0.7 6.85,0.9 6.85,0.5 7.25,0.7
  lines w0.254: -41.5,-13 -38,-13 -38,-5 -41.5,-5 -41.5,-13 ; -41.5,14.05 -38,14.05 -38,20.55 -41.5,20.55 -41.5,14.05 ; -6.375,-41.5 4.5,-41.5 4.5,-37 -6.375,-37 -6.375,-41.5
  text "DEBUG" at -4.1,39.6 h1
  text "RF" at -40.8,29.7 h1
  text "GNSS USB2.0" at 30,20 h1
  text "GNSS" at -41.4,12.4 h1
  text "x" at -1.1,10.2 h0.75 r270
  text "z" at -0.675,8.15 h0.75 r180
  text "y" at -3.75,7.625 h0.75
  text "MCU USB2.0" at 30.5,1.5 h1
  text "x" at 6.75,1.275 h0.75
  text "z" at 4.2,1.225 h0.75
  text "y" at 4.175,-0.975 h0.75
  text "MCU" at -41.3,-14.55 h1
  text "ETH" at 31.2,-25.3 h1
  text "ETH" at -6.3,-43.3 h1
Bottom Overlay:
  drawing of 42 lines, arcs and shapes, not listed
  text "CCLERC 2026" at -2.75,-36.75 h1
  text "Ublox GNSS Node / Version 2.0" at -21.1,-38.5 h1
Mechanical 1:
  lines w0.254: -6,54 6,54 13,42 ; -3.123,-54 3.123,-54 ; -3.123,-53.996 cw(c-3.123,-48.996) -7.454,-51.496 -13,-42 ; -3.123,54 3.123,54 ; -3.123,54.021 ccw(c-3.123,49.021) -7.454,51.521 -13,42 -32,42 ccw(c-32,32) -42,32 -42,-32 ccw(c-32,-32) -32,-42 -21,-42 ; 3.123,-54.021 ccw(c3.123,-49.021) 7.454,-51.521 13,-42 ; 3.123,53.996 cw(c3.123,48.996) 7.454,51.496 13,42 ; -21,-42 -13,-42 ; -21,-42 -13,-42 ; -13,-42 -6,-54 6,-54 13,-42 ; 13,-42 32,-42 ; 13,-42 32,-42 ; 13,42 32,42 cw(c32,32) 42,32 42,-32 cw(c32,-32) 32,-42

## Text inside footprints (layer, text, board x,y; h text height)
"MIKROBUS 1": Top Overlay "SDA" at -18.874,-19.67 h1.78 r90; Top Overlay "RST" at -29.034,-34.105 h1.78 r90; Top Overlay "CS" at -26.494,-34.105 h1.78 r90; Top Overlay "MISO" at -21.414,-34.105 h1.78 r90; Top Overlay "SCK" at -23.954,-34.105 h1.78 r90; Top Overlay "MOSI" at -18.874,-34.105 h1.78 r90; Top Overlay "+3.3V" at -16.334,-34.105 h1.78 r90; Top Overlay "GND" at -13.794,-34.105 h1.78 r90; Top Overlay "SCL" at -21.414,-19.437 h1.78 r90; Top Overlay "INT" at -29.034,-18.852 h1.78 r90; Top Overlay "RX" at -26.494,-18.543 h1.78 r90; Top Overlay "TX" at -23.954,-18.454 h1.78 r90; Top Overlay "GND" at -13.794,-19.83 h1.78 r90; Top Overlay "+5V" at -16.334,-19.246 h1.78 r90; Top Overlay "AN" at -31.574,-34.105 h1.78 r90; Top Overlay "PWM" at -31.574,-20.115 h1.78 r90
U4: Top Overlay "*" at 8.3,-11 h1.27 r180; Top 3D Body "*" at 8.361,-9.316 h1.27 r180